# Altium PCB Catan_board.PcbDoc (part 3 of 3)
Units mm, origin at the board's own origin, x right, y up, seen from the top; angles counter-clockwise.
Board outline 80 x 59.64 mm, 2 copper layers (Top Layer, Bottom Layer), stack 1.448 mm thick; 132 components, 59 nets, 410 pads, 538 vias.
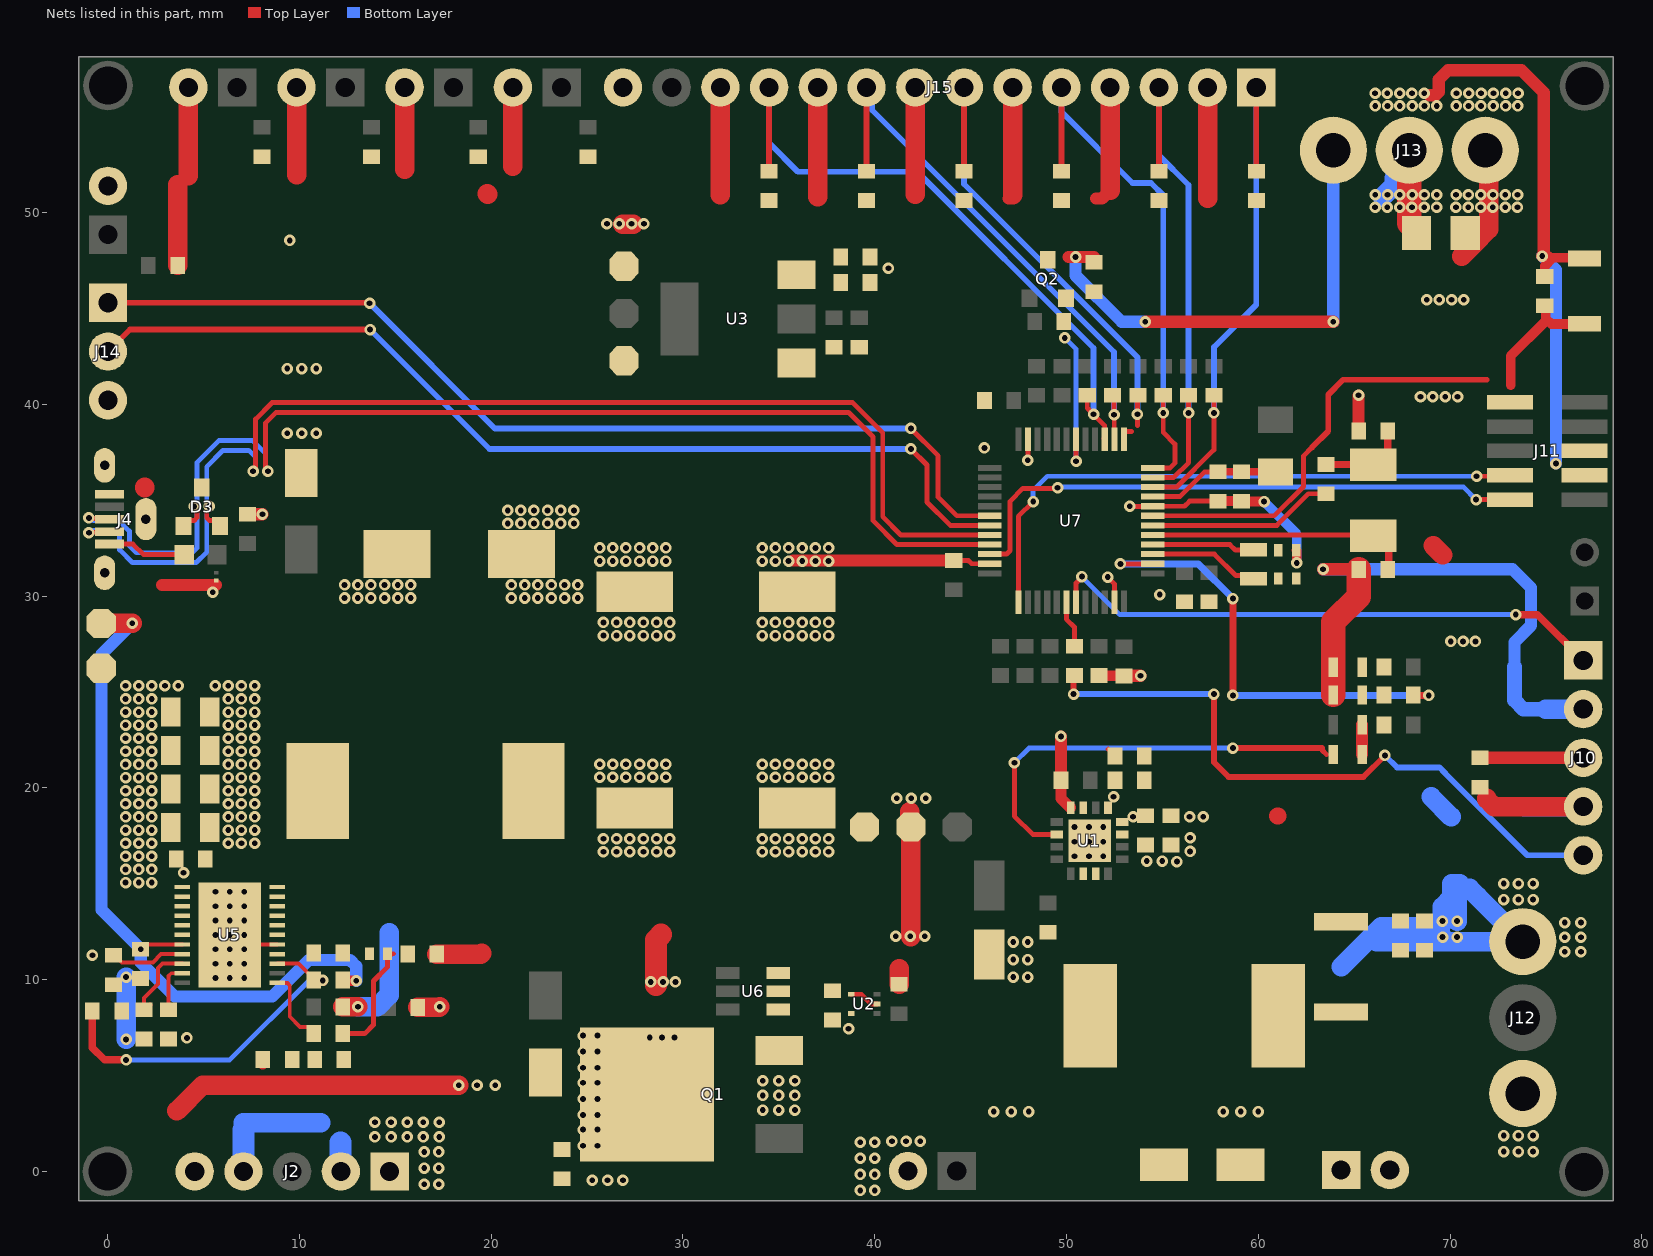
[diagram p2: the nets of this part, all layers, seen from the top]

## Via types
v1: diameter 0.6, hole 0.3, Top Layer to Bottom Layer, 536 vias
v2: diameter 0.6, hole 0.3, Top Layer to Bottom Layer, tented both sides, 2 vias

## Nets (pads, with @x,y where several pads share a name; then routed paths per layer and width w, separated by ;. In a path a pad name is that pad's centre, name@x,y a point inside that pad or via, vN(x,y) a via of type N, cw(c..) or ccw(c..) an arc to the next point about the centre after c; other vN are vias at no path point) (continued)
GND: C1.2 C2.1 C3.1 C4.1 C5.1 C6.1 C7.1 C8.1 C9.1 C10.1 C11.1 C12.1 C13.1 C14.1 C15.1 C16.1 C17.1 C18.1 C19.1 C20.1 C21.1 C22.1 C23.2 C24.2 C25.1 C26.1 C27.1 C28.1 C29.1 C30.2 C31.1 C32.2 C33.1 C36.2 C37.2 C38.1 C40.1 C41.1 C42.1 C43.1 C44.1 C45.1 C46.1 C47.1 C48.1 C49.2 C50.2 C51.2 C52.2 C53.2 C54.2 D1.2 D3.3 D4.2 J1.2 J2.5 J3.2 J4.5 J4.SH1 J4.SH2 J4.SH3 J5.2 J6.2 J7.2 J8.2 J9.2 J10.2 J11.3 J11.5 J12.1 J13.2 J14.3 J15.2 J15.4 J15.6 J15.8 J15.10 J15.12 LED3.2 LED4.2 P9.1 R9.2 R14.1 R17.2 R19.2 R31.1 SW1.2 U1.7 U1.11 U1.12 U1.17 U2.2 U2.4 U3.1 U5. U5.5 U5.23 U6.2 U6.3 U7.8 U7.23 U7.35 U7.47 | length 185.9
  Top Layer w0.203: U5.23@7.469,11.832 U5.5@8.85,11.832
  Top Layer w0.254: U5.23@6.922,11.555 7.016,11.555 U5.23@7.266,11.805 ; U2.4@38.771,9.238 39.302,9.238 39.802,8.738 U2.2@40.121,8.738 ; C16.1@43.84,31.852 C16.1@44.12,31.852 44.882,31.852 45.049,31.684 U7.35@45.991,31.684 ; v1(47.981,37.084) 47.986,37.089 47.986,38.179 U7.23@47.991,38.184 ; v1(52.146,30.988) 52.496,30.638 52.496,29.69 U7.47@52.491,29.684 ; v1(53.296,34.678) 54.484,34.678 U7.8@54.491,34.684 56.147,34.684 56.413,34.95 C14.1@57.887,34.95 ; C21.1@59.131,34.95 C21.1@59.157,34.925
  Top Layer w0.508: C14.1@57.887,34.95 C21.1@59.131,34.95 ; C21.1@59.157,34.925 v1(60.3,34.925) v1@60.317,34.925 ; C13.1@61.976,32.385 62.001,32.36 v1(62.001,31.725) ; v1(74.803,47.727) 75.108,47.727 75.191,47.643 77.013,47.643 77.06,47.596 SW1.2@77.013,47.596 ; C22.1@74.93,46.66 74.93,47.219 75.311,47.6 ; v1(75.514,36.906) v1@75.54,36.906 ; SW1.2@76.354,47.6 SW1.2@77.009,47.6
  Top Layer w0.559: R14.1@8.077,5.613 R14.1@8.095,5.596 ; C5.1@49.708,20.396 49.708,19.444 50.181,18.971 U1.12@50.215,18.971 ; R9.2@51.699,25.857 51.712,25.845 52.972,25.845 C15.1@52.984,25.832
  Top Layer w0.635: 2.845,30.582 5.664,30.582 ; C42.1@7.29,34.265 v1(8.077,34.265) ; 9.855,51.968 9.906,51.918 ; 15.494,52.248 15.545,52.197 ; 31.852,50.825 31.953,50.927 ; v1@35.734,31.852 C16.1@43.84,31.852 ; 37.008,50.8 37.033,50.825 ; 46.99,50.724 47.193,50.927 ; C5.1@49.708,20.396 v1(49.708,22.682) ; 51.537,50.724 51.854,50.724 52.273,51.143 ; C15.1@52.994,25.841 v1(53.857,25.841) ; C19.1@56.153,29.687 C19.1@56.159,29.693 ; 57.353,50.749 57.379,50.724 ; v1(63.373,31.394) C23.2@65.227,31.394 ; C24.2@65.227,38.608 v1(65.227,40.462) ; 68.936,56.109 69.24,56.109 69.406,56.274 69.406,56.934 69.884,57.413 73.717,57.413 74.879,56.25 74.879,47.803 v1(74.803,47.727)
  Top Layer w1.016: 1.93,35.662 1.937,35.655 ; 3.619,3.162 4.953,4.496 v1(18.313,4.496) ; C47.1@3.658,47.244 3.658,51.435 ; 4.216,51.918 J8.2@4.216,56.515 J8.2@4.216,56.566 ; 9.855,51.968 J7.2@9.855,56.515 J7.2@9.855,56.566 ; 15.494,52.248 J6.2@15.494,56.515 J6.2@15.494,56.566 ; R31.1@16.18,8.56 17.297,8.56 v1(17.323,8.585) ; 19.787,50.978 19.812,50.952 ; 21.133,52.409 J5.2@21.133,56.515 J5.2@21.133,56.566 ; 31.953,50.927 J15.12@31.953,56.515 ; 37.033,50.825 J15.10@37.033,56.515 ; C41.1@41.275,9.754 41.275,10.566 ; 42.113,50.952 J15.8@42.113,56.515 ; 47.193,50.927 J15.6@47.193,56.515 ; 52.273,51.143 J15.4@52.273,56.515 ; 57.353,50.749 J15.2@57.353,56.515
  Top Layer w1.27: LED4.2@63.906,24.841 LED3.2@63.906,26.289 63.906,28.651 65.227,29.972 C23.2@65.227,31.394 ; J13.2@67.869,53.238 67.869,49.428 68.25,49.047 C38.1@68.25,48.92
  Bottom Layer w0.508: v1@60.317,34.907 62.001,33.223 v1(62.001,31.725)
  Bottom Layer w0.635: v1(63.373,31.394) 73.254,31.394 74.219,30.429 74.219,28.458 73.355,27.594 73.355,26.314 ; v1(74.803,47.727) 75.514,47.015 v1(75.514,36.906)
  Bottom Layer w0.762: 73.355,26.314 73.355,24.562 73.812,24.105 74.981,24.105
  Bottom Layer w1.016: v1(0.965,6.883) v1(0.965,10.135) ; v1@66.472,50.8 67.09,51.419 67.09,51.788 67.869,52.566 J13.2@67.869,53.238 ; 74.981,24.105 J10.2@76.937,24.105
  other v1: 39.243,-0.991 40.005,-0.991 25.273,-0.457 26.073,-0.457 26.873,-0.457 39.243,-0.152 40.005,-0.152 39.243,0.686 40.005,0.686 72.796,1.037 73.558,1.037 74.32,1.037 39.243,1.524 40.005,1.524 40.894,1.575 41.631,1.575 42.367,1.575 72.796,1.875 73.558,1.875 74.32,1.875 46.203,3.124 47.117,3.124 48.031,3.124 58.166,3.124 59.08,3.124 59.995,3.124 19.266,4.496 20.218,4.496 4.14,6.96 47.219,10.135 47.981,10.135 47.219,11.049 47.981,11.049 47.219,11.963 47.981,11.963 55.753,16.154 54.178,16.18 54.991,16.18 50.419,16.434 51.168,16.434 51.918,16.434 34.138,16.664 34.823,16.664 35.509,16.664 36.22,16.664 36.906,16.664 37.592,16.664 56.439,16.688 6.299,17.114 6.985,17.114 7.671,17.114 50.419,17.196 51.168,17.196 51.918,17.196 34.138,17.348 34.823,17.348 35.509,17.348 36.22,17.348 36.906,17.348 37.592,17.348 56.439,17.399 6.299,17.798 6.985,17.798 7.671,17.798 50.419,17.958 51.168,17.958 51.918,17.958 6.299,18.482 6.985,18.482 7.671,18.482 6.299,19.166 6.985,19.166 7.671,19.166 6.299,19.85 6.985,19.85 7.671,19.85 6.299,20.534 6.985,20.534 7.671,20.534 34.138,20.549 34.823,20.549 35.509,20.549 36.22,20.549 36.906,20.549 37.592,20.549 6.299,21.218 6.985,21.218 7.671,21.218 34.138,21.233 34.823,21.233 35.509,21.233 36.22,21.233 36.906,21.233 37.592,21.233 6.299,21.902 6.985,21.902 7.671,21.902 6.299,22.586 6.985,22.586 7.671,22.586 6.299,23.27 6.985,23.27 7.671,23.27 6.299,23.954 6.985,23.954 7.671,23.954 6.299,24.638 6.985,24.638 7.671,24.638 5.613,25.322 6.299,25.322 6.985,25.322 7.671,25.322 34.138,27.942 34.823,27.942 35.509,27.942 36.22,27.942 36.906,27.942 37.592,27.942 34.138,28.626 34.823,28.626 35.509,28.626 36.22,28.626 36.906,28.626 37.592,28.626 12.361,29.898 13.047,29.898 13.733,29.898 14.444,29.898 15.13,29.898 15.816,29.898 54.864,30.074 5.486,30.199 12.361,30.582 13.047,30.582 13.733,30.582 14.444,30.582 15.13,30.582 15.816,30.582 34.138,31.826 34.823,31.826 35.509,31.826 36.22,31.826 36.906,31.826 37.592,31.826 34.138,32.51 34.823,32.51 35.509,32.51 36.22,32.51 36.906,32.51 37.592,32.51 45.72,37.719 40.716,47.092 9.5,48.539 66.082,50.267 66.724,50.267 67.366,50.267 68.008,50.267 68.649,50.267 69.291,50.267 66.093,50.927 66.735,50.927 67.377,50.927 68.019,50.927 68.66,50.927 69.302,50.927 66.093,55.55 66.735,55.55 67.377,55.55 68.019,55.55 68.66,55.55 69.302,55.55 66.082,56.21 66.724,56.21 67.366,56.21 68.008,56.21 68.649,56.21
HV_LED_DATA: J13.3 Q2.3 R8.2 | length 25.7
  Top Layer w0.635: 50.102,47.676 v1(50.467,47.676) R8.2@51.435,47.676 ; v1(54.108,44.298) v1(63.909,44.298)
  Bottom Layer w0.635: v1(50.467,47.676) 50.467,46.706 52.876,44.298 v1(54.108,44.298) ; v1(63.909,44.298) J13.3@63.909,53.238
I/O1: C49.1 J15.1 R15.2 U7.10 | length 29.2
  Top Layer w0.254: U7.10@54.491,35.684 55.75,35.684 57.683,37.617 R15.2@57.683,40.437
  Top Layer w0.305: C49.1@59.893,52.045 J15.1@59.893,56.515
  Bottom Layer w0.305: v1(57.683,39.548) 57.683,42.977 59.893,45.187 J15.1@59.893,56.515
I/O2: C50.1 J15.3 R16.2 U7.11 | length 27.4
  Top Layer w0.254: U7.11@54.491,36.184 55.59,36.184 56.363,36.957 v1(56.363,39.548) R16.2@56.363,40.234
  Top Layer w0.305: C50.1@54.813,52.146 J15.3@54.813,56.515
  Bottom Layer w0.305: J15.3@54.813,56.515 54.813,52.984 56.363,51.435 v1(56.363,39.548)
I/O3: C51.1 J15.5 R25.2 U7.12 | length 29.1
  Top Layer w0.254: U7.12@54.491,36.684 55.404,36.684 55.651,36.932 55.651,37.922 55.042,38.532 v1(55.042,39.548) R25.2@55.042,40.437
  Top Layer w0.305: C51.1@49.733,52.146 J15.5@49.733,56.515
  Bottom Layer w0.305: J15.5@49.733,56.515 49.733,55.245 53.442,51.537 54.407,51.537 55.042,50.902 v1(55.042,39.548)
I/O4: C52.1 J15.7 R27.2 U7.13 | length 27.5
  Top Layer w0.254: U7.13@52.991,38.184 52.991,38.544 53.024,38.577 53.383,38.577 ; 53.696,38.889 v1(53.696,39.472) 53.696,40.437 R27.2@53.721,40.462
  Top Layer w0.305: C52.1@44.653,52.146 J15.7@44.653,56.515
  Bottom Layer w0.305: J15.7@44.653,56.515 44.653,51.486 53.696,42.443 v1(53.696,39.472)
I/O5: C53.1 J15.9 R28.2 U7.14 | length 29.1
  Top Layer w0.254: R28.2@52.4,40.462 52.476,40.386 v1(52.476,39.446) 52.484,39.439 52.484,38.192 U7.14@52.491,38.184
  Top Layer w0.305: C53.1@39.573,52.146 J15.9@39.573,56.515
  Bottom Layer w0.305: J15.9@39.573,56.515 39.854,56.234 39.854,55.345 52.476,42.723 v1(52.476,39.446)
I/O6: C54.1 J15.11 R29.2 U7.15 | length 34.4
  Top Layer w0.254: R29.2@51.079,40.462 51.079,39.802 51.994,38.887 U7.15@51.994,38.532 ; U7.15@51.958,38.217 U7.15@51.991,38.184
  Top Layer w0.305: C54.1@34.493,52.146 J15.11@34.493,56.515
  Bottom Layer w0.305: J15.11@34.493,56.515 34.493,53.619 35.992,52.121 42.215,52.121 51.41,42.926 v1(51.41,39.472)
LATCH: J10.1 U7.43 | length 29.4
  Top Layer w0.254: U7.43@50.491,29.684 50.491,30.675 50.8,30.984 v1(50.8,31.013)
  Top Layer w0.381: v1(73.424,29.032) 74.549,29.032 J10.1@76.937,26.645
  Bottom Layer w0.254: v1(50.8,31.013) 52.781,29.032 v1(73.424,29.032)
LED_DATA: Q2.2 R7.2 U7.18 | length 7.8
  Top Layer w0.254: U7.18@50.491,38.184 50.491,37.037 v1(50.495,37.033)
  Bottom Layer w0.254: v1(49.911,43.459) 50.495,42.875 v1(50.495,37.033)
LED_LAT: J10.5 R26.1 | length 34
  Top Layer w0.254: R26.1@50.368,25.811 R26.1@50.414,25.857
  Top Layer w0.305: v1(50.368,24.892) R26.1@50.368,25.811 ; v1(57.683,24.892) 57.683,21.336 58.445,20.574 65.481,20.574 v1(66.599,21.692)
  Bottom Layer w0.305: v1(50.368,24.892) v1(57.683,24.892) ; v1(66.599,21.692) 67.234,21.057 69.45,21.057 69.723,20.784 69.723,20.777 74.016,16.485 J10.5@76.937,16.485
LL: C34.1 L2.1 R3.1 U5.6 U5.7 U5.8 U5.9 U5.10 U5.11
LX: D1.1 L1.1 U1.2 U1.3
MCU_SWCLK: J11.4 U7.37 | length 31.3
  Top Layer w0.254: U7.37@47.491,29.684 47.491,34.156 v1(48.26,34.925) ; v2(71.374,36.246) 73.062,36.246 J11.4@73.113,36.297
  Bottom Layer w0.254: v1(48.26,34.925) 48.26,35.509 48.997,36.246 v2(71.374,36.246)
MCU_SWDIO: J11.2 U7.34 | length 30.3
  Top Layer w0.254: U7.34@45.991,32.184 46.867,32.184 47.059,32.376 47.059,34.944 47.727,35.611 49.5,35.611 v1(49.53,35.641) ; v2(71.349,35.027) J11.2@73.113,35.027
  Bottom Layer w0.254: v1(49.53,35.641) 49.566,35.677 70.698,35.677 v2(71.349,35.027)
MODE: R17.1 R18.1 U5.20 | length 4.3
  Top Layer w0.203: R17.1@1.905,8.433 1.905,9.042 2.642,9.779 2.642,10.617 2.857,10.832 U5.20@3.9,10.832
  Top Layer w0.254: R17.1@1.905,8.433 1.968,8.433 R17.1@2.222,8.687
NetC13_2: C13.2 U7.4 X1.1 | length 5.4
  Top Layer w0.254: U7.4@54.491,32.684 58.513,32.684 58.807,32.391 X1.1@59.741,32.391
NetC14_2: C14.2 C21.2 FB1.2 U7.9 | length 6.9
  Top Layer w0.254: U7.9@54.491,35.184 55.911,35.184 57.201,36.474 C14.2@57.887,36.474
  Top Layer w0.381: C14.2@57.887,36.474 C21.2@59.131,36.474 FB1.2@60.884,36.474
NetC18_2: C18.2 U7.3 X1.2 | length 5.8
  Top Layer w0.254: U7.3@54.491,32.184 57.706,32.184 58.82,31.071 59.581,31.071 X1.2@59.741,30.91
NetC23_1: C23.1 U7.5 X2.2 | length 12.8
  Top Layer w0.254: U7.5@54.491,33.184 65.952,33.184 X2.2@65.989,33.147
  Top Layer w0.381: C23.1@66.802,31.394 X2.2@66.802,32.639
NetC24_1: C24.1 R30.2 X2.1 | length 4.6
  Top Layer w0.305: X2.1@65.989,36.847 66.054,36.847 X2.1@66.751,37.545
  Top Layer w0.381: R30.2@63.525,36.855 X2.1@65.989,36.855 ; X2.1@66.751,37.545 C24.1@66.751,38.608
NetC34_2: C34.2 U5.4
NetC35_2: C35.2 C55.1 R3.2 | length 6.1
  Top Layer w0.254: C55.1@12.268,7.188 13.411,7.188 13.868,7.645 13.868,9.931 14.592,10.655 R3.2@14.592,11.354 ; R3.2@14.668,11.189 14.834,11.354 14.91,11.354
NetF1_1: F1.1 J4.1 | length 4.1
  Top Layer w0.254: J4.1@0.102,32.711 1.325,32.711 1.88,32.156 F1.1@4.001,32.156
NetJ10_3: J10.3 R5.1 | length 5.4
  Top Layer w0.635: R5.1@71.552,21.565 J10.3@76.937,21.565
NetLED1_1: LED1.1 LED2.1 R2.2 | length 1.6
  Top Layer w0.508: LED1.1@65.406,23.292 LED1.1@65.41,23.288 ; R2.2@66.527,23.288 R2.2@66.548,23.266
  Top Layer w0.635: LED2.1@65.406,21.742 LED1.1@65.406,23.292
NetLED3_1: LED3.1 R6.1
NetLED4_1: LED4.1 R10.1
NetR19_1: R19.1 U5.21 | length 2.5
  Top Layer w0.203: R19.1@3.175,8.433 3.175,10.184 3.324,10.332 U5.21@3.9,10.332
NetR30_1: R30.1 U7.6 | length 9.7
  Top Layer w0.254: U7.6@54.491,33.684 60.964,33.684 62.611,35.331 R30.1@63.525,35.331
NRST: C22.2 J11.10 SW1.1 U7.7 | length 29.4
  Top Layer w0.254: U7.7@54.491,34.184 60.829,34.184 62.357,35.712 62.357,37.313 62.789,37.744
  Top Layer w0.305: 62.789,37.744 63.64,38.595 63.64,40.5 64.414,41.275 71.907,41.275
  Top Layer w0.508: J11.10@73.113,40.107 J11.10@73.159,40.152 ; 73.152,40.996 73.152,42.52 74.93,44.298 ; C22.2@74.93,45.136 74.981,45.085 74.981,44.475 75.278,44.178 76.944,44.178 76.969,44.152 SW1.1@77.013,44.196
PB6: R26.2 U7.42 | length 2.5
  Top Layer w0.254: U7.42@49.991,29.684 49.991,28.8 50.414,28.377 R26.2@50.414,27.381
PGOOD: R12.2 R18.2 U5.3 | length 18.7
  Top Layer w0.203: U5.3@8.85,10.832 9.957,10.832 R12.2@10.744,10.046
  Top Layer w0.254: R12.2@10.744,9.982 R12.2@10.744,10.046
  Top Layer w0.381: R18.2@-0.787,8.357 -0.787,6.452 -0.152,5.817 v1(0.965,5.817)
  Top Layer w0.559: R12.2@10.744,9.982 10.762,9.965 11.219,9.965 v1(11.227,9.957)
  Bottom Layer w0.254: v1(0.965,5.817) 6.375,5.817 10.516,9.957 v1(11.227,9.957)
RX: J14.2 U7.31 | length 51.8
  Top Layer w0.254: v1(41.885,37.668) 42.723,36.83 42.723,34.9 43.938,33.684 U7.31@45.991,33.684
  Top Layer w0.305: J14.2@0.025,42.748 1.168,43.891 v1(13.691,43.891)
  Bottom Layer w0.305: v1(13.691,43.891) 19.914,37.668 v1(41.885,37.668)
S\T\D\B\Y\: LED2.2 U1.14 | length 22.1
  Top Layer w0.254: v1(47.282,21.311) 47.282,18.529 48.24,17.571 U1.14@49.481,17.571 ; 63.316,21.971 63.558,21.73
  Top Layer w0.305: v1(58.674,22.073) 63.316,22.073
  Bottom Layer w0.254: v1(47.282,21.311) 48.044,22.073 v1(58.674,22.073)
TEST: R10.2 U7.2 | length 24.4
  Top Layer w0.254: v1(52.807,31.674) 52.812,31.679 54.486,31.679 U7.2@54.491,31.684 ; R10.2@68.072,24.841 R10.2@68.097,24.816
  Top Layer w0.381: v1(58.674,24.816) v1(58.674,29.87) ; R10.2@68.097,24.816 v1(68.885,24.816)
  Bottom Layer w0.381: v1(52.807,31.674) 56.871,31.674 v1(58.674,29.87) ; v1(58.674,24.816) v1(68.885,24.816)
TX: J14.1 U7.30 | length 51.8
  Top Layer w0.254: v1(41.885,38.735) 43.307,37.313 43.307,35.154 44.276,34.184 U7.30@45.991,34.184
  Top Layer w0.305: J14.1@0.025,45.288 13.64,45.288 v1(13.665,45.263)
  Bottom Layer w0.305: v1(13.665,45.263) 20.193,38.735 v1(41.885,38.735)
USB_D_N: D3.2 J4.2 U7.32 | length 65.4
  Top Layer w0.254: v1(-0.965,33.297) -0.933,33.329 0.07,33.329 J4.2@0.102,33.361 ; v1(5.306,34.671) 5.171,34.536 5.171,34.083 5.32,33.934 5.588,33.934 D3.2@5.867,33.655 ; v1(7.587,36.5) 7.587,36.593 7.722,36.728 7.722,39.225 8.578,40.081 38.844,40.081 40.417,38.508 40.417,34.134 41.366,33.184 U7.32@45.991,33.184
  Bottom Layer w0.254: v1(-0.965,33.297) -0.872,33.297 -0.737,33.432 0.381,33.432 0.635,33.178 0.635,32.403 1.288,31.75 4.63,31.75 5.171,32.291 5.171,34.442 5.306,34.577 v1(5.306,34.671) 5.306,34.765 5.171,34.9 5.171,36.744 6.02,37.592 7.366,37.592 7.722,37.236 7.722,36.703 7.587,36.568 v1(7.587,36.5)
USB_D_P: D3.1 J4.3 U7.33 | length 65.4
  Top Layer w0.254: v1(-0.965,34.074) -0.933,34.043 0.07,34.043 J4.3@0.102,34.011 ; D3.1@3.967,33.655 4.247,33.934 4.515,33.934 4.663,34.083 4.663,34.534 v1(4.528,34.669) ; v1(8.364,36.5) 8.364,36.593 8.23,36.728 8.23,39.014 8.788,39.573 38.633,39.573 39.909,38.298 39.909,34.134 39.917,34.126 39.917,33.927 41.159,32.684 U7.33@45.991,32.684
  Bottom Layer w0.254: v1(-0.965,34.074) -0.872,34.074 -0.737,33.94 0.591,33.94 1.143,33.388 1.143,32.614 1.499,32.258 4.42,32.258 4.663,32.502 4.663,34.441 4.528,34.576 v1(4.528,34.669) 4.528,34.763 4.663,34.898 4.663,36.954 5.809,38.1 7.576,38.1 8.23,37.447 8.23,36.703 8.364,36.568 v1(8.364,36.5)
VBAT: C6.2 C7.2 C8.2 C31.2 C40.2 J3.1 J12.3 P2.1 Q1.3 R1.2 U1.9 U2.5 U6.1 | length 30.4
  Top Layer w0.254: C7.2@52.165,22.015 C7.2@52.172,22.022
  Top Layer w1.016: 41.834,18.745 41.834,18.009 P2.1@41.885,17.958 v1@41.885,12.243
  Bottom Layer w1.016: 64.313,10.668 65.895,12.251 66.396,12.751 69.507,12.751 ; 66.162,11.984 v1@69.606,11.984 ; 69.012,19.533 70.053,18.491 ; v1(69.596,13.056) 69.596,13.792 70.079,14.275 70.079,15.011 70.51,15.011 ; v1(69.606,12.223) v1@69.606,11.984 ; v1(70.358,13.056) 70.358,15.011 ; 71.016,14.755 71.435,14.336 J12.3@73.787,11.984 70.358,11.984 v1@69.606,11.984
  other v1: 34.163,3.2 35.001,3.2 35.839,3.2 34.163,3.962 35.001,3.962 35.839,3.962 34.163,4.724 35.001,4.724 35.839,4.724 38.633,7.442 75.976,11.451 76.814,11.451 70.358,12.217 75.976,12.213 76.814,12.213 41.097,12.268 41.855,12.268 42.613,12.268 75.976,12.975 76.814,12.975 72.796,14.173 73.558,14.173 74.32,14.173 72.796,15.011 73.558,15.011 74.32,15.011 41.148,19.456 41.906,19.456 42.664,19.456 52.451,19.533
VCC: C25.2 C26.2 C27.2 C28.2 C29.2 C33.2 J2.2 J2.4 P5.1 R11.1 U5.12 U5.13 U5.14 U5.15 U5.16 U5.17 U5.19 | length 18.1
  Top Layer w0.203: C33.2@0.318,11.265 0.381,11.265 0.749,10.897 2.362,10.897 2.798,11.332 U5.19@3.9,11.332
  Top Layer w1.016: R11.1@12.268,8.585 v1(13.056,8.585)
  Bottom Layer w1.016: 7.087,2.159 7.468,2.54 ; 7.087,2.54 7.468,2.54 ; 11.125,2.54 7.468,2.54 ; J2.2@12.147,0.019 J2.2@12.167,0 ; v1(13.056,8.585) 14.068,8.585 14.679,9.197 14.679,12.45
  Bottom Layer w1.143: J2.4@7.087,0 7.087,2.159 ; J2.2@12.147,0.019 12.147,1.518
  other v1: -0.787,11.278 0.94,15.062 1.626,15.062 2.311,15.062 3.962,15.57 0.94,15.746 1.626,15.746 2.311,15.746 0.94,16.43 1.626,16.43 2.311,16.43 0.94,17.114 1.626,17.114 2.311,17.114 0.94,17.798 1.626,17.798 2.311,17.798 0.94,18.482 1.626,18.482 2.311,18.482 0.94,19.166 1.626,19.166 2.311,19.166 0.94,19.85 1.626,19.85 2.311,19.85 0.94,20.534 1.626,20.534 2.311,20.534 0.94,21.218 1.626,21.218 2.311,21.218 0.94,21.902 1.626,21.902 2.311,21.902 0.94,22.586 1.626,22.586 2.311,22.586 0.94,23.27 1.626,23.27 2.311,23.27 0.94,23.954 1.626,23.954 2.311,23.954 0.94,24.638 1.626,24.638 2.311,24.638 0.94,25.322 1.626,25.322 2.311,25.322 2.997,25.322 3.683,25.322
VCC#: C48.2 D2.1 J2.1 P4.1 Q1.2 | length 4.6
  Top Layer w1.016: Q1.2@28.122,4.013 Q1.2@29.447,5.338
  Top Layer w1.143: 28.6,9.728 28.6,12.078 28.867,12.344
  other v1: 16.51,-0.66 17.272,-0.66 16.51,0.178 17.272,0.178 16.51,1.016 17.272,1.016 24.79,1.346 25.552,1.346 13.945,1.803 14.783,1.803 15.621,1.803 16.459,1.803 17.297,1.803 24.79,2.184 25.552,2.184 13.945,2.565 14.783,2.565 15.621,2.565 16.459,2.565 17.297,2.565 24.79,2.946 25.552,2.946 24.79,3.785 25.552,3.785 24.79,4.623 25.552,4.623 24.79,5.41 25.552,5.41 24.79,6.248 25.552,6.248 28.27,6.985 28.914,6.985 29.557,6.985 24.79,7.087 25.552,7.087 28.321,9.881 28.964,9.881 29.608,9.881
VCC_5V: C9.2 C10.2 C30.1 C35.1 C36.1 C37.1 C38.2 D5.1 J10.4 J13.1 J15.14 L2.2 P8.1 R5.2 R8.1 R13.2 U3.3 | length 19.2
  Top Layer w1.016: D5.1@10.084,36.392 D5.1@10.109,36.417 ; C35.1@17.17,11.328 19.456,11.328 19.507,11.379 ; v1@26.873,49.378 v1@27.407,49.378 ; 69.113,32.635 69.608,32.14 ; 70.612,47.727 72.007,49.121 ; C38.2@71.234,48.349 72.007,49.121 ; 71.907,19.469 71.907,19.406 72.288,19.025 J10.4@76.937,19.025 ; J13.1@72.007,53.315 72.007,49.121
  Bottom Layer w1.016: 73.863,19.025 J10.4@76.937,19.025
  other v1: 25.857,16.664 26.543,16.664 27.229,16.664 27.94,16.664 28.626,16.664 29.312,16.664 25.857,17.348 26.543,17.348 27.229,17.348 27.94,17.348 28.626,17.348 29.312,17.348 25.658,20.549 26.343,20.549 27.029,20.549 27.74,20.549 28.426,20.549 29.112,20.549 25.658,21.233 26.343,21.233 27.029,21.233 27.74,21.233 28.426,21.233 29.112,21.233 70.028,27.635 70.671,27.635 71.315,27.635 25.857,27.942 26.543,27.942 27.229,27.942 27.94,27.942 28.626,27.942 29.312,27.942 25.857,28.626 26.543,28.626 27.229,28.626 27.94,28.626 28.626,28.626 29.312,28.626 21.061,29.898 21.747,29.898 22.433,29.898 23.144,29.898 23.83,29.898 24.516,29.898 21.061,30.582 21.747,30.582 22.433,30.582 23.144,30.582 23.83,30.582 24.516,30.582 25.658,31.826 26.343,31.826 27.029,31.826 27.74,31.826 28.426,31.826 29.112,31.826 25.658,32.51 26.343,32.51 27.029,32.51 27.74,32.51 28.426,32.51 29.112,32.51 20.862,33.782 21.548,33.782 22.233,33.782 22.945,33.782 23.63,33.782 24.316,33.782 20.862,34.466 21.548,34.466 22.233,34.466 22.945,34.466 23.63,34.466 24.316,34.466 9.373,38.481 10.13,38.481 10.888,38.481 68.453,40.386 69.096,40.386 69.74,40.386 70.383,40.386 9.373,41.859 10.13,41.859 10.888,41.859 68.783,45.441 69.427,45.441 70.07,45.441 70.714,45.441 26.035,49.403 26.678,49.403 27.322,49.403 27.965,49.403 70.299,50.267 70.941,50.267 71.582,50.267 72.224,50.267 72.866,50.267 73.508,50.267 70.307,50.927 70.949,50.927 71.591,50.927 72.233,50.927 72.874,50.927 73.516,50.927 70.319,55.55 70.961,55.55 71.603,55.55 72.245,55.55 72.886,55.55 73.528,55.55 70.328,56.21 70.97,56.21 71.611,56.21 72.253,56.21 72.895,56.21 73.537,56.21
VFB: C55.2 R13.1 R14.2 U5.1 | length 4
  Top Layer w0.203: U5.1@8.85,9.832 8.86,9.823 9.381,9.823 9.5,9.704 9.5,8.077 10.046,7.531 10.465,7.531 10.744,7.252 C55.2@10.744,7.188
  Top Layer w0.254: C55.2@10.719,7.163 C55.2@10.744,7.188
VREG: C32.1 P7.1 R12.1 U5.18 | length 37.4
  Top Layer w0.203: C32.1@1.727,11.832 U5.18@3.9,11.832
  Top Layer w0.559: R12.1@12.268,9.982 12.311,9.939 v1(12.972,9.939)
  Top Layer w1.016: P7.1@-0.33,28.575 v1(1.295,28.575)
  Bottom Layer w0.559: v1@1.727,11.594 v1(1.727,11.582) v1@1.735,11.575
  Bottom Layer w0.635: v1(1.295,28.575) -0.305,26.975 -0.305,13.626 v1@1.727,11.594 ; v1@1.735,11.575 1.735,10.889 3.505,9.119 8.585,9.119 10.49,11.024 12.644,11.024 12.972,10.696 v1(12.972,9.939)
VS: C3.2 C4.2 L1.2 R1.1 U1.8 | length 0
  Top Layer w0.889: 61.011,18.542 61.032,18.521
  other v1: 53.467,18.491 56.413,18.491 57.125,18.491
pads on no net: J2.3 J4.4 J11.6 J11.7 J11.8 J11.9 J12.2 U1.6 U2.3 U5.22 U6.4 U7.16 U7.17 U7.21 U7.22 U7.25 U7.26 U7.27 U7.28 U7.29 U7.38 U7.45 U7.46

## Polygon pours and split planes (outlines as drawn)
GND on Top Layer "GND_L01_P000" (solid, remove dead copper, pour order 0): 1.041,0.864 75.997,0.864 75.997,55.575 1.041,55.575
GND on Bottom Layer "GND_L02_P001" (solid, remove dead copper, pour order 1): 1.041,0.864 75.997,0.864 75.997,55.575 1.041,55.575

## Other copper
Top Layer:
  region net VCC_5V: 55.347,49.018 52.324,49.018 52.324,46.55 55.347,46.55
  rectangle net GND: 55.601,47.93 67.854,51.206
  region net VCC: 4.318,12.217 4.318,27.203 -1.245,27.203 -1.245,12.217
  region net GND: 2.438,28.55 3.632,29.743 1.143,32.233 -0.051,31.039
  rectangle net GND: 2.413,28.55 5.029,30.912
  rectangle net GND: -0.991,30.011 1.168,32.233
  region net NetC34_2: 8.407,11.539 8.407,11.125 10.744,11.125 10.744,11.539
  region net VS: 62.202,5.385 62.202,19.025 58.699,19.025 58.699,5.385
  region net GND: 38.735,1.93 38.735,-1.364 42.774,-1.364 42.774,1.93
  rectangle net 12V: 21.59,7.899 32.983,8.788
  rectangle net NRST: 74.295,43.637 77.902,45.517
  region net GND: 74.371,48.793 74.371,46.072 77.953,46.072 77.953,48.793
  region net VBAT: 77.241,13.567 74.647,13.567 74.647,10.185 77.241,10.185
  rectangle net GND: 65.913,47.93 69.723,56.591
  rectangle net VFB: 10.287,5.309 11.227,7.747
  region net NetC35_2: 14.351,11.811 14.351,10.871 16.053,10.871 16.053,11.811
  rectangle net LL: 11.709,10.871 14.046,22.504
  rectangle net LX: 50.775,1.448 53.746,13.818
  region net VCC#: 30.074,8.966 30.074,13.113 27.813,13.113 27.813,8.966
  region net VCC#: 40.488,11.506 40.488,18.999 38.481,18.999 38.481,11.506
  rectangle net VCC#: 27.813,11.43 40.488,13.183
  rectangle net VBAT: 40.792,11.709 42.977,20.066
  region net GND: 48.565,2.108 48.565,4.14 39.903,4.14 39.903,2.108
  region net 12V: 43.231,1.93 43.231,-1.364 47.269,-1.364 47.269,1.93
  rectangle net GND: 33.147,13.513 38.049,38.659
  rectangle net GND: 39.37,45.771 41.046,48.158
  rectangle net I/O4: 52.832,37.49 53.873,38.887
  region net NetC23_1: 67.183,33.325 66.345,33.325 66.345,30.861 67.183,30.861
  rectangle net NetC24_1: 66.37,36.678 67.208,39.141
  rectangle net VCC_5V: 50.952,44.983 56.871,46.736
  rectangle net NRST: 71.653,39.649 74.778,41.529
  rectangle net VCC_5V: 70.968,17.856 78.308,20.252
  rectangle net VCC_5V: 68.097,27.153 71.8,33.96
  rectangle net VCC_5V: 68.109,27.254 70.688,40.869
  region net VCC_5V: 73.812,44.983 73.812,47.697 55.042,47.697 55.042,44.983
  rectangle net VCC_5V: 69.926,46.558 73.787,56.642
  region net VCC_5V: 25.07,40.513 25.07,43.231 8.992,43.231 8.992,40.513
  rectangle net VCC_5V: 21.768,40.564 25.095,49.962
  rectangle net VCC_5V: 8.915,34.696 11.379,39.014
  rectangle net GND: 25.959,41.758 27.991,43.307
  rectangle net GND: 25.959,40.945 42.215,42.24
  rectangle net 3V3: 30.328,42.545 34.087,46.355
  rectangle net VCC_5V: 24.714,46.152 28.03,47.346
  rectangle net 3V3: 25.908,43.688 30.785,45.771
  rectangle net VCC_5V: 38.456,48.337 55.347,49.936
  rectangle net VCC_5V: 22.53,46.634 35.179,49.936
  region net GND: 18.059,5.004 18.059,3.988 20.955,3.988 20.955,5.004
  rectangle net S\T\D\B\Y\: 62.89,21.133 64.225,22.327
  rectangle net C\R\H\G\: 62.89,22.682 64.225,23.876
  rectangle net NetLED4_1: 65.075,24.232 66.929,25.4
  rectangle net NetLED3_1: 65.075,25.679 66.929,26.822
  rectangle net GND: 2.87,35.179 5.436,36.144
  rectangle net BUCK_EN: 40.742,8.23 41.732,8.763
  rectangle net GND: 34.849,40.945 46.279,43.434
  rectangle net 3V3: 28.778,43.688 47.066,45.491
  rectangle net VCC_5V: 34.9,45.847 38.71,49.936
  region net GND: 46.279,41.529 45.06,41.529 45.06,37.16 46.279,37.16
  rectangle net GND: 11.836,35.331 38.041,38.989
  rectangle net VCC_5V: 18.364,13.513 30.074,34.849
  rectangle net 12V: 43.332,15.85 45.263,18.745
  rectangle net GND: 11.836,29.286 16.154,38.405
  rectangle net GND: 6.68,26.746 16.154,30.912
  rectangle net 12V: 67.437,16.84 69.418,23.857
  rectangle net 12V: 21.604,7.925 24.257,11.455
  rectangle net LX: 49.784,-0.914 56.388,1.549
  rectangle net LX: 49.809,-0.635 52.705,10.846
  rectangle net GND: 57.734,1.448 67.615,3.632
  rectangle net LL: 8.433,12.192 13.97,22.504
  rectangle net GND: 4.724,9.576 7.95,30.912
  rectangle net 3V3: 52.527,26.975 54.254,27.813
  rectangle net GND: 1.219,33.02 3.124,35.281
  rectangle net 5V_USB: 6.629,31.115 11.467,33.68
  rectangle net 5V_USB: 5.156,31.115 10.744,32.995
  rectangle net VCC: 11.735,8.077 12.344,9.093
  rectangle net 3V3: 55.728,30.836 57.836,31.598
  rectangle net GND: 54.483,29.108 57.963,30.48
  rectangle net 3V3: 67.412,25.781 68.123,26.797
  rectangle net GND: 75.082,35.89 78.232,37.998
  rectangle net 12V: 67.539,23.19 68.555,23.749
  rectangle net GND: 53.645,15.672 56.896,17.805
  rectangle net NetLED1_1: 65.024,22.733 67.031,23.851
  rectangle net 3V3: 43.51,25.07 44.742,31.039
  rectangle net 3V3: 43.51,24.765 49.593,26.365
  rectangle net 3V3: 46.457,39.243 47.727,46.253
  region net GND: 4.166,46.634 4.166,47.498 3.15,47.498 3.15,46.634
  region net GND: 54.712,25.349 54.712,26.34 51.206,26.34 51.206,25.349
  region net VCC_5V: 18.39,14.249 18.39,5.207 20.98,5.207 20.98,14.249
  rectangle net GND: 1.499,-1.041 5.74,7.366
  rectangle net BUCK_EN: 39.929,6.299 41.732,8.407
  region net GND: 61.697,2.692 57.734,2.692 57.734,-0.889 61.697,-0.889
  rectangle net GND: 34.341,9.576 48.743,11.252
  rectangle net GND: 4.724,3.937 8.001,11.074
  region net GND: 0.508,7.417 0.508,6.401 5.334,6.401 5.334,7.417
  region net GND: 3.124,35.077 3.124,41.326 -1.092,41.326 -1.092,35.077
  rectangle net GND: 65.862,-1.143 67.793,1.753
  region net GND: 8.585,6.299 7.569,6.299 7.569,3.937 8.585,3.937
  rectangle net GND: 40.767,9.22 41.783,10.109
  rectangle net VCC: -1.245,10.795 0.991,12.522
  rectangle net VREG: 1.219,11.176 2.235,12.04
  rectangle net GND: 39.903,-0.965 42.774,3.48
  rectangle net GND: 22.911,-1.372 42.774,0.229
  rectangle net VCC#: 13.691,-1.143 22.377,3.785
  rectangle net VCC_5V: 11.913,5.207 20.447,6.477
  rectangle net GND: -1.27,50.165 61.976,51.46
  rectangle net GND: -1.27,50.267 25.654,53.315
  rectangle net VCC#: 21.514,0.533 31.75,7.569
  rectangle net BUCK_EN: 10.109,8.026 11.125,9.169
  rectangle net PGOOD: 10.363,9.525 11.582,10.465
  rectangle net VFB: 9.144,5.309 11.176,6.375
  rectangle net MODE: 0.33,7.899 2.388,8.839
  rectangle net GND: -0.178,9.271 0.991,10.008
  rectangle net GND: -0.178,9.728 2.184,10.516
  rectangle net 3V3: 47.447,41.224 61.519,42.824
  region net GND: 62.382,30.582 62.382,32.868 61.544,32.868 61.544,30.582
  rectangle net 3V3: 47.396,41.58 48.793,46.253
  rectangle net HV_LED_DATA: 48.565,46.965 52.045,48.031
  rectangle net LED_DATA: 49.424,43.104 50.618,46.279
  rectangle net NetC18_2: 59.03,30.556 61.316,31.394
  rectangle net NetC13_2: 59.03,32.029 61.316,32.868
  rectangle net GND: 67.005,-1.143 75.387,5.817
  rectangle net GND: 66.929,2.235 69.19,11.989
  rectangle net VBAT: 70.917,10.16 75.667,12.548
  rectangle net VBAT: 62.789,12.319 75.667,15.494
  rectangle net VS: 59.665,5.385 66.472,10.871
  rectangle net 12V: 51.943,14.249 53.238,15.85
  rectangle net 12V: 52.527,14.249 53.416,16.485
  rectangle net GND: 50.013,16.129 51.079,19.329
  rectangle net GND: 53.543,19.685 54.712,26.289
  rectangle net VBAT: 51.918,18.644 52.375,19.99
  rectangle net VBAT: 51.918,19.202 52.934,22.301
  rectangle net VS: 52.553,18.009 61.747,19.025
  rectangle net GND: 52.019,17.348 56.769,17.78
  rectangle net GND: 43.358,11.074 49.759,12.979
  rectangle net 12V: 49.708,13.564 50.419,15.85
  rectangle net 12V: 43.332,13.564 49.809,16.485
  rectangle net VBAT: 33.655,2.845 39.141,8.788
  rectangle net GND: 34.341,9.017 39.065,10.744
  rectangle net LX: 50.648,-0.356 51.714,15.85
  pour cut-out: 49.733,14.224 49.733,1.93 62.56,1.93 62.56,14.224 62.535,14.224
  pour cut-out: 9.093,13.627 23.927,13.627 23.927,26.15 9.093,26.15
Bottom Layer:
  region net GND: 64.567,51.41 64.567,47.93 68.453,47.93 68.453,51.41
  region net VCC_5V: 73.787,56.667 69.999,56.667 69.999,39.954 73.787,39.954
  rectangle net VS: 53.01,18.136 57.455,18.847
  region net GND: 38.735,1.981 38.735,-1.364 42.774,-1.364 42.774,1.981
  rectangle net GND: 33.376,16.383 38.075,35.811
  rectangle net GND: 11.735,29.312 16.485,31.14
  rectangle net VCC: 3.382,15.066 15.799,16.586
  rectangle net GND: 5.207,16.789 8.103,25.73
  region net VCC: -1.245,11.76 -1.245,1.626 0.279,1.626 0.279,11.76
  rectangle net VCC: 0.356,13.832 4.369,25.705
  region net VBAT: 49.454,19.787 40.691,19.787 40.691,17.653 49.454,17.653
  region net VBAT: 69.012,20.574 57.683,20.574 57.683,18.593 69.012,18.593
  region net VBAT: 72.263,17.755 69.355,20.663 68.136,19.444 71.044,16.535
  region net GND: 56.947,17.932 53.696,17.932 53.696,15.799 56.947,15.799
  rectangle net 12V: 21.539,13.36 62.408,15.574
  rectangle net 12V: 38.506,14.503 49.683,16.789
  rectangle net 12V: 21.539,13.602 53.492,15.888
  rectangle net 12V: 57.633,14.453 62.408,16.739
  rectangle net 12V: 67.61,21.615 69.444,24.003
  region net VCC#: 30.074,0.432 30.074,7.671 24.282,7.671 24.282,0.432
  region net VCC#: 30.074,0.406 30.074,10.338 27.813,10.338 27.813,0.406
  rectangle net GND: 49.911,16.078 52.349,18.364
  region net VCC: 16.129,7.954 16.129,16.612 13.56,16.612 13.56,7.954
  region net VCC: 12.725,3.734 -1.092,3.734 -1.092,1.626 12.725,1.626
  region net VBAT: 43.002,12.929 37.846,12.929 37.846,7.112 43.002,7.112
  rectangle net VBAT: 75.006,10.16 77.292,13.614
  rectangle net VBAT: 63.424,10.16 75.59,15.316
  region net VCC_5V: 11.405,42.85 8.941,42.85 8.941,32.848 11.405,32.848
  region net GND: 48.692,12.344 45.847,12.344 45.847,2.718 48.692,2.718
  region net VBAT: 69.393,20.647 40.665,20.647 40.665,19.025 69.393,19.025
  region net VBAT: 72.26,13.894 72.26,17.742 70.206,17.742 70.206,13.894
  region net VBAT: 70.482,15.164 70.482,19.012 68.758,19.012 68.758,15.164
  region net VBAT: 37.846,13.005 37.846,11.074 43.002,11.074 43.002,13.005
  region net 12V: 43.231,1.981 43.231,-1.364 47.269,-1.364 47.269,1.981
  rectangle net 3V3: 74.803,28.27 78.054,30.886
  rectangle net VCC_5V: 73.163,17.856 78.097,20.295
  region net VCC_5V: 74.917,19.622 71.412,23.127 69.657,21.372 73.162,17.866
  region net VCC_5V: 72.263,28.067 69.635,28.067 69.635,21.353 72.263,21.353
  region net VCC_5V: 70.688,47.498 68.097,47.498 68.097,39.954 70.688,39.954
  region net GND: 69.771,56.591 65.936,56.591 65.936,47.93 69.771,47.93
  rectangle net VCC_5V: 8.865,32.842 29.743,35.712
  rectangle net VCC_5V: 25.679,48.87 28.194,57.76
  rectangle net VCC_5V: 18.618,16.231 30.131,35.712
  region net VBAT: 62.814,15.316 62.814,-1.041 65.481,-1.041 65.481,15.316
  region net 12V: 24.257,14.205 21.546,14.205 21.546,10.135 24.257,10.135
  region net 12V: 57.633,18.39 57.633,15.596 68.555,15.596 68.555,18.39
  region net GND: 60.35,4.14 45.822,4.14 45.822,2.235 60.35,2.235
  rectangle net GND: 5.034,9.712 7.538,14.878
  rectangle net VBAT: 33.833,2.845 36.424,5.08
  rectangle net VCC#: 13.614,-1.143 17.678,3.194
  region net GND: 27.305,0.254 18.313,0.254 18.313,-1.219 27.305,-1.219
  region net GND: 20.98,-1.219 20.98,5.004 17.958,5.004 17.958,-1.219
  rectangle net 12V: 43.205,-1.016 45.618,16.18

## Silkscreen, mask and mechanical layers (free items; w line width, h text height)
Top Overlay:
  lines w0.254: 12.725,9.939 13.226,9.939 13.411,9.754 13.411,9.271
  text "5V" at 27.389,53.442 h1.52 r90
  text "I/01" at 60.51,53.035 h1.52 r90
  text "I/06" at 35.11,52.934 h1.52 r90
  text "I/05" at 40.19,52.934 h1.52 r90
  text "I/04" at 45.27,52.934 h1.52 r90
  text "I/03" at 50.274,52.934 h1.52 r90
  text "I/02" at 55.38,52.934 h1.52 r90
  text "3V3" at 29.954,52.73 h1.52 r90
  text "GND" at 15.933,52.248 h1.52 r90
  text "GND" at 21.699,52.248 h1.52 r90
  text "GND" at 32.52,52.248 h1.52 r90
  text "GND" at 37.6,52.248 h1.52 r90
  text "GND" at 42.68,52.248 h1.52 r90
  text "GND" at 47.76,52.248 h1.52 r90
  text "GND" at 52.84,52.248 h1.52 r90
  text "GND" at 57.92,52.248 h1.52 r90
  text "GND" at 10.396,52.197 h1.52 r90
  text "GND" at 4.656,52.172 h1.52 r90
  text "#" at 7.671,51.248 h1.52
  text "#" at 13.411,51.248 h1.52
  text "#" at 18.974,51.248 h1.52
  text "#" at 24.689,51.248 h1.52
  text "BUTT1" at 24.087,50.978 h1.52 r90
  text "BUTT3" at 12.784,50.825 h1.52 r90
  text "BUTT2" at 18.346,50.825 h1.52 r90
  text "BUTT4" at 7.043,50.806 h1.52 r90
  text "GND" at 1.524,50.742 h1.52
  text "#" at 39.218,49.038 h1.52
  text "#" at 44.272,49.038 h1.52
  text "#" at 49.352,49.038 h1.52
  text "#" at 54.458,49.038 h1.52
  text "#" at 59.538,49.038 h1.52
  text "#" at 34.138,49.013 h1.52
  text "BUTT5" at 1.524,48.202 h1.52
  text "#" at 74.574,47.311 h1.52
  text "#" at 41.335,47.295 h1.52 r90
  text "#" at 5.292,46.863 h1.52 r90
  text "5V" at 22.703,46.558 h1.52
  text "DATA" at 64.287,45.949 h1.65 r90
  text "5V" at 73.157,45.885 h1.65 r90
  text "GND" at 67.223,45.848 h1.65 r90
  text "TX" at 1.473,44.653 h1.52
  text "&" at 50.978,44.323 h1.52
  text "3V3" at 22.691,44.094 h1.52
  text "&" at 46.812,43.866 h1.52
  text "&" at 47.981,42.596 h1.52
  text "&" at 49.301,42.596 h1.52
  text "&" at 50.622,42.596 h1.52
  text "&" at 51.943,42.596 h1.52
  text "&" at 53.264,42.596 h1.52
  text "&" at 54.585,42.596 h1.52
  text "&" at 55.905,42.596 h1.52
  text "&" at 57.226,42.596 h1.52
  text "RESET" at 73.764,42.418 h1.52
  text "RX" at 1.473,42.113 h1.52
  text "#" at 45.999,41.868 h1.52 r180
  text "GND" at 22.835,41.725 h1.52
  text "#" at 37.516,41.317 h1.52
  text "GND" at 1.473,39.591 h1.52
  text "USB" at 2.146,36.805 h1.52
  text "DEBUGGING" at 71.755,33.94 h1.52 r90
  text "#" at 7.544,32.115 h1.52 r180
  text "#" at 43.739,28.693 h1.52
  text "BOOT" at 75.717,28.397 h1.52 r90
  text "#" at 55.855,28.109 h1.52
  text "VREG" at 0.787,28.085 h1.52
  text "COM" at 72.278,25.883 h1.52
  text "VCC" at 0.787,25.747 h1.52
  text "PWR" at 58.724,25.654 h1.52
  text "#" at 53.391,25.206 h1.52 r180
  text "&" at 46.101,24.231 h1.52
  text "&" at 47.384,24.231 h1.52
  text "&" at 48.666,24.231 h1.52
  text "TEST" at 58.724,24.206 h1.52
  text "NO" at 72.278,23.444 h1.52
  text "CHRG" at 58.724,22.657 h1.52
  text "&" at 71.095,22.072 h1.52
  text "STDBY" at 58.016,21.107 h1.52
  text "NC" at 72.278,20.803 h1.52
  text "#" at 48.048,20.777 h1.52 r270
  text "#" at 55.66,20.041 h1.52 r90
  text "VBAT" at 42.367,19.126 h1.52 r90
  text "VCC#" at 40.107,18.999 h1.52 r90
  text "12V" at 44.933,18.999 h1.52 r90
  text "+" at 72.278,18.263 h1.52
  text "#" at 6.715,15.926 h1.52 r90
  text "-" at 72.278,15.672 h1.52
  text "#" at 53.746,15.434 h1.52
  text "#" at 69.037,14.639 h1.52 r180
  text "#" at 11.963,12.056 h1.52
  text "#" at 18.805,10.998 h1.52 r90
  text "+VE" at 71.806,10.946 h1.52 r90
  text "#" at 48.666,10.888 h1.52
  text "&" at 6.528,5.359 h1.52
  text "-" at 3.81,4.659 h1.52 r270
  text "+" at 6.401,4.659 h1.52 r270
  text "BATTERY" at 70.612,3.242 h1.52 r90
  text "-VE" at 71.806,3.242 h1.52 r90
  text "BATTERY" at 62.713,2.337 h1.02
  text "MONITORING" at 62.713,1.422 h1.02
  text "NC" at 10.262,1.387 h1.52 r90
  text "NO" at 12.878,1.387 h1.52 r90
  text "COM" at 15.24,1.387 h1.52 r90
  text "CHARGING PORT" at 40.386,1.372 h1.02
  text "#" at 21.962,-0.076 h1.52 r270
Bottom Overlay:
  drawing of 3075 lines, arcs and shapes, not listed
  text "ZERO CARBON FOOTPRINT" at 47.409,24.483 h0.97
  text "NOTE:" at 9.064,4.216 h1.52
  text "# >> 0.1uF 0603" at 9.051,2.899 h1.52
  text "& >> 10K 0603" at 9.051,1.575 h1.52
Board Outline:
  the board outline again, w0.254
Fabrication:
  drawing of 327 lines, arcs and shapes, not listed
  text "Layer" at 85.751,61.454 h1.52
  text "Name" at 96.163,61.454 h1.52
  text "Material" at 119.778,61.454 h1.52
  text "Thickness" at 141.616,61.454 h1.52
  text "Constant" at 158.122,61.454 h1.52
  text "Board Layer Stack" at 172.597,61.454 h1.52
  text "Top Overlay" at 96.163,58.406 h1.52
  text "Top Solder" at 96.163,55.358 h1.52
  text "Solder Resist" at 119.778,55.358 h1.52
  text "3.00mil" at 141.616,55.358 h1.52
  text "3.5" at 158.122,55.358 h1.52
  text "1" at 85.751,52.31 h1.52
  text "Top Layer" at 96.163,52.31 h1.52
  text "10.00mil" at 141.616,52.31 h1.52
  text "Dielectric 1" at 96.163,49.262 h1.52
  text "FR-4" at 119.778,49.262 h1.52
  text "37.00mil" at 141.616,49.262 h1.52
  text "4.8" at 158.122,49.262 h1.52
  text "2" at 85.751,46.214 h1.52
  text "Bottom Layer" at 96.163,46.214 h1.52
  text "10.00mil" at 141.616,46.214 h1.52
  text "Bottom Solder" at 96.163,43.166 h1.52
  text "Solder Resist" at 119.778,43.166 h1.52
  text "3.00mil" at 141.616,43.166 h1.52
  text "3.5" at 158.122,43.166 h1.52
  text "Bottom Overlay" at 96.163,40.118 h1.52
Drill Drawing:
  circle w0.254: c1.895,94.038 r0.847
  lines w0.254: 1.049,77.951 1.049,78.374 1.472,78.798 1.049,79.221 1.049,79.644 1.472,79.644 1.895,79.221 2.319,79.644 2.742,79.644 2.742,79.221 2.319,78.798 2.742,78.374 2.742,77.951 2.319,77.951 1.895,78.374 1.472,77.951 1.049,77.951 ; 1.049,81.761 1.895,82.184 2.742,81.761 2.319,82.608 2.742,83.454 1.895,83.031 1.049,83.454 1.472,82.608 1.049,81.761 ; 1.049,85.994 1.472,85.994 1.472,85.571 2.319,85.571 2.319,85.994 2.742,85.994 2.742,86.841 2.319,86.841 2.319,87.264 1.472,87.264 1.472,86.841 1.049,86.841 1.049,85.994 ; 1.049,89.804 1.472,89.804 1.895,89.381 2.319,89.804 2.742,89.804 2.319,90.228 2.742,90.651 2.319,90.651 1.895,91.074 1.472,90.651 1.049,90.651 1.472,90.228 1.049,89.804 ; 1.049,98.694 2.742,98.694 1.895,97.001 1.049,98.694 ; 1.049,100.811 2.742,100.811 2.742,102.504 1.049,102.504 1.049,100.811
  lines w0.381: -0.47,76.808 191.298,76.808 ; -0.47,103.478 191.298,103.478 ; 13.522,72.998 13.522,107.288 ; 28.504,72.998 28.504,107.288 ; 56.436,72.998 56.436,107.288 ; 69.286,72.998 69.286,107.288 ; 87.924,72.998 87.924,107.288 ; 126.013,72.998 126.013,107.288 ; 140.995,72.998 140.995,107.288 ; 159.938,72.998 159.938,107.288 ; -0.47,72.998 191.298,72.998 191.298,107.288 -0.47,107.288 -0.47,72.998
  text "Symbol" at 1.816,104.621 h1.83
  text "Count" at 14.665,104.621 h1.83
  text "Hole Size" at 29.647,104.621 h1.83
  text "Plated" at 57.579,104.621 h1.83
  text "Hole Type" at 70.429,104.621 h1.83
  text "Drill Layer Pair" at 89.067,104.621 h1.83
  text "Via/Pad" at 127.156,104.621 h1.83
  text "Pad Shape" at 142.138,104.621 h1.83
  text "Template" at 161.081,104.621 h1.83
  text "559" at 14.665,100.811 h1.52
  text "11.81mil (0.300mm)" at 29.647,100.811 h1.52
  text "PTH" at 57.579,100.811 h1.52
  text "Round" at 70.429,100.811 h1.52
  text "Top Layer - Bottom Layer" at 89.067,100.811 h1.52
  text "(Mixed)" at 127.156,100.811 h1.52
  text "Rounded" at 142.138,100.811 h1.52
  text "(Mixed)" at 161.081,100.811 h1.52
  text "2" at 14.665,97.001 h1.52
  text "19.69mil (0.500mm)" at 29.647,97.001 h1.52
  text "PTH" at 57.579,97.001 h1.52
  text "Slot" at 70.429,97.001 h1.52
  text "Top Layer - Bottom Layer" at 89.067,97.001 h1.52
  text "Pad" at 127.156,97.001 h1.52
  text "Rounded" at 142.138,97.001 h1.52
  text "r180_110h50_120r100" at 161.081,97.001 h1.52
  text "1" at 14.665,93.191 h1.52
  text "19.69mil (0.500mm)" at 29.647,93.191 h1.52
  text "PTH" at 57.579,93.191 h1.52
  text "Slot" at 70.429,93.191 h1.52
  text "Top Layer - Bottom Layer" at 89.067,93.191 h1.52
  text "Pad" at 127.156,93.191 h1.52
  text "Rounded" at 142.138,93.191 h1.52
  text "r220_110h50_160r100" at 161.081,93.191 h1.52
  text "2" at 14.665,89.381 h1.52
  text "35.43mil (0.900mm)" at 29.647,89.381 h1.52
  text "PTH" at 57.579,89.381 h1.52
  text "Round" at 70.429,89.381 h1.52
  text "Top Layer - Bottom Layer" at 89.067,89.381 h1.52
  text "Pad" at 127.156,89.381 h1.52
  text "(Mixed)" at 142.138,89.381 h1.52
  text "(Mixed)" at 161.081,89.381 h1.52
  text "41" at 14.665,85.571 h1.52
  text "39.37mil (1.000mm)" at 29.647,85.571 h1.52
  text "PTH" at 57.579,85.571 h1.52
  text "Round" at 70.429,85.571 h1.52
  text "Top Layer - Bottom Layer" at 89.067,85.571 h1.52
  text "Pad" at 127.156,85.571 h1.52
  text "(Mixed)" at 142.138,85.571 h1.52
  text "(Mixed)" at 161.081,85.571 h1.52
  text "6" at 14.665,81.761 h1.52
  text "70.87mil (1.800mm)" at 29.647,81.761 h1.52
  text "PTH" at 57.579,81.761 h1.52
  text "Round" at 70.429,81.761 h1.52
  text "Top Layer - Bottom Layer" at 89.067,81.761 h1.52
  text "Pad" at 127.156,81.761 h1.52
  text "Rounded" at 142.138,81.761 h1.52
  text "c350h180" at 161.081,81.761 h1.52
  text "4" at 14.665,77.951 h1.52
  text "78.74mil (2.000mm)" at 29.647,77.951 h1.52
  text "NPTH" at 57.579,77.951 h1.52
  text "Round" at 70.429,77.951 h1.52
  text "Top Layer - Bottom Layer" at 89.067,77.951 h1.52
  text "Pad" at 127.156,77.951 h1.52
  text "Rounded" at 142.138,77.951 h1.52
  text "c260hn200m265" at 161.081,77.951 h1.52
  text "615 Total" at 14.665,74.141 h1.52
  text "Slot definitions :" at 1.816,70.459 h1.52
  text "Routed Path Length" at 28.046,70.459 h1.52
  text "= Calculated from tool start centre position to tool end centre position." at 56.054,70.459 h1.52
  text "Hole Length" at 28.046,67.919 h1.52
  text "= Routed Path Length + Tool Size = Slot length as defined in the PCB layout" at 45.644,67.919 h1.52

## Dimensions
-1.499,58.115 to -1.499,-1.524 on Dimension
-1.499,58.115 to 78.501,58.115 on Dimension

## Text inside footprints (layer, text, board x,y; h text height)
J12: Top Overlay "PCB Edge" at 77.996,4.824 h1.52 r90
J13: Top Overlay "PCB Edge" at 71.069,57.447 h1.52 r180